# Altium PCB NB3000XN.PcbDoc (part 40 of 71)
Units mil, origin at the board's own origin, x right, y up, seen from the top; angles counter-clockwise.
Board outline 9527.56 x 6929.77 mil, 6 copper layers (Top Layer, GND+SHIELD, MidLayer1, MidLayer2, P2 - 3V3+5V0, Bottom Layer), stack 62.375 mil thick; 832 components, 1027 nets, 4655 pads, 4981 vias.
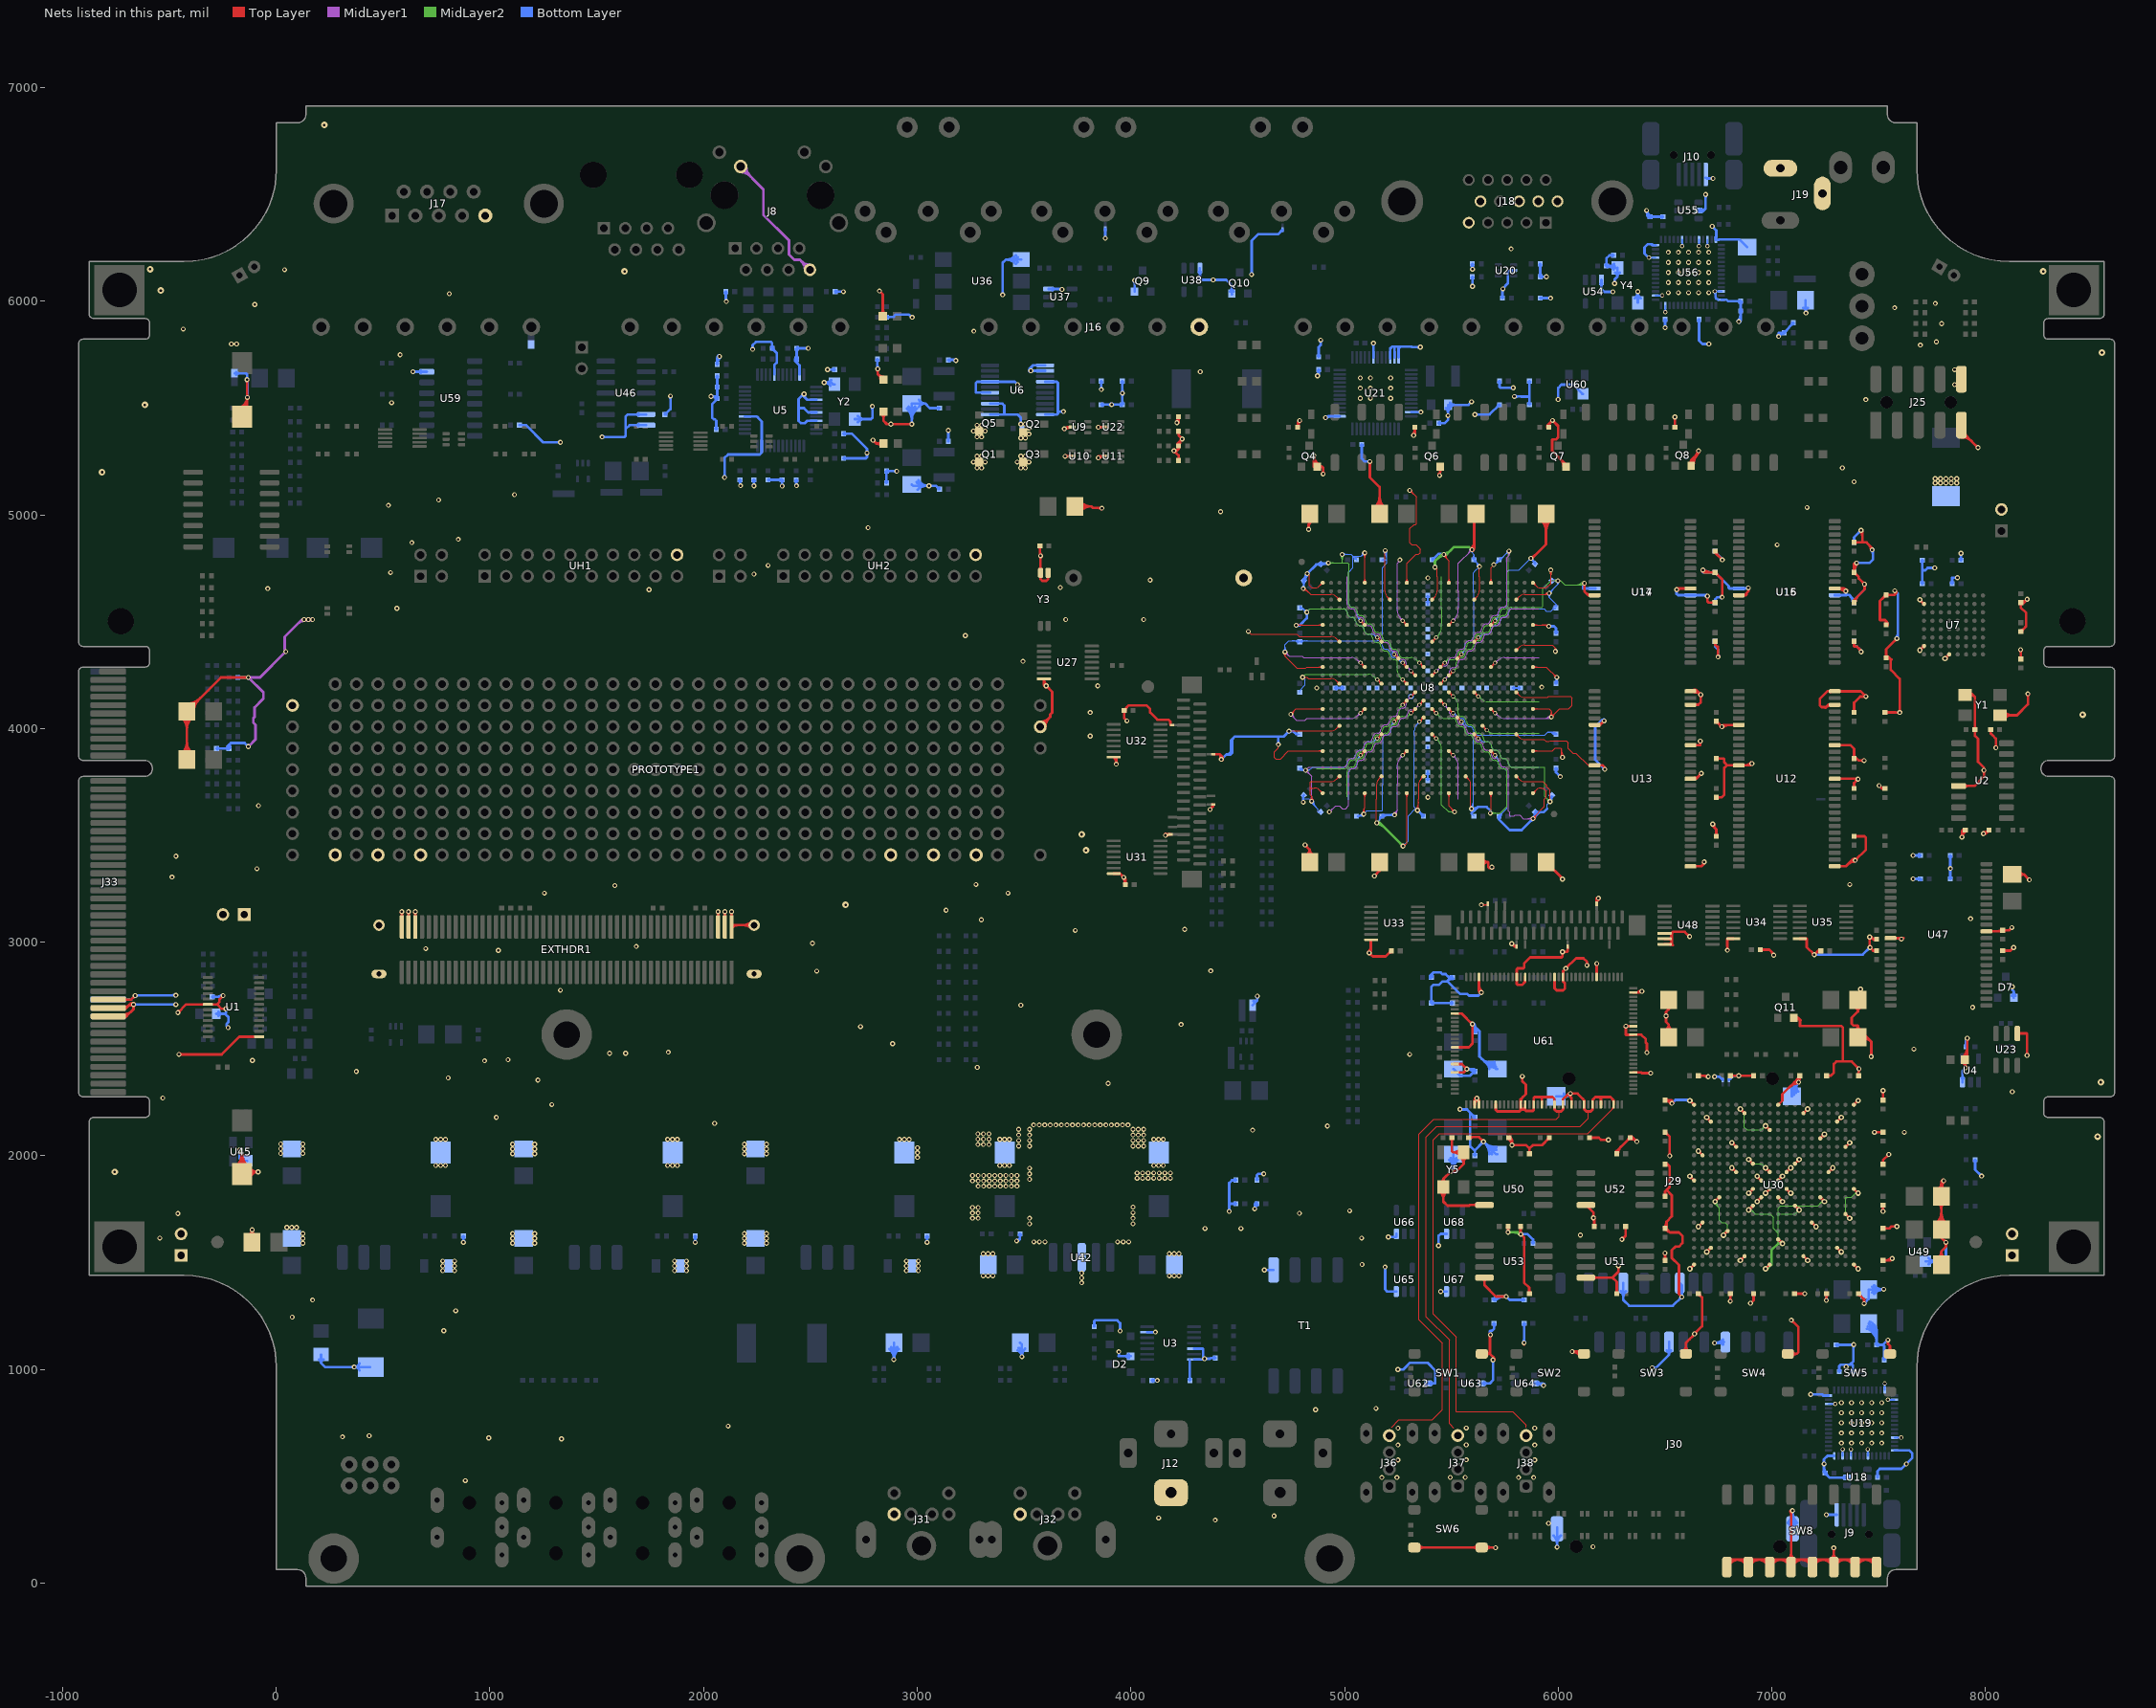
[diagram p44: the nets of this part, all layers, seen from the top]

## Via types
v1: diameter 23, hole 11.81, Top Layer to Bottom Layer, 3672 vias
v2: diameter 26, hole 11.81, Top Layer to Bottom Layer, 461 vias
v3: diameter 19, hole 11.81, Top Layer to Bottom Layer, tented both sides, 396 vias
v4: diameter 23.62, hole 11.81, Top Layer to Bottom Layer, 288 vias
v5: diameter 20, hole 11.81, Top Layer to Bottom Layer, 91 vias
v6: diameter 23, hole 11.81, Top Layer to Bottom Layer, tented both sides, 50 vias
v7: diameter 31, hole 11.81, Top Layer to Bottom Layer, 15 vias
v8: diameter 27.56, hole 11.81, Top Layer to Bottom Layer, tented both sides, 4 vias
v9: diameter 29, hole 11.81, Top Layer to Bottom Layer, 3 vias
v10: diameter 21, hole 11.81, Top Layer to Bottom Layer, 1 vias

## Nets (pads, with @x,y where several pads share a name; then routed paths per layer and width w, separated by ;. In a path a pad name is that pad's centre, name@x,y a point inside that pad or via, vN(x,y) a via of type N, cw(c..) or ccw(c..) an arc to the next point about the centre after c; other vN are vias at no path point) (continued)
GND: BT1.2 C1.2 C2.2 C3.2 C4.2 C7.2 C13.2 C18.2 C20.2 C21.2 C33.2 C34.2 C35.2 C36.2 C37.1 C39.1 C40.2 C41.1 C42.1 C43.2 C44.2 C45.1 C46.1 C47.1 C48.1 C49.2 C50.1 C51.1 C52.1 C53.1 C54.1 C55.2 C56.2 C57.2 C58.2 C59.2 C60.2 C61.2 C62.2 C63.2 C64.2 C65.2 C66.2 C67.2 C68.2 C69.2 C70.2 C71.2 C72.2 C73.2 C74.2 C75.2 C76.2 C77.2 C78.2 C79.2 C80.2 C81.2 C82.2 C83.2 C84.2 C85.2 C86.2 C87.2 C88.1 C89.2 C90.1 C91.1 C92.1 C93.2 C94.2 C95.2 C96.2 C98.2 C99.1 C100.2 C115.2 C116.2 C121.1 C122.1 C123.1 C124.1 C125.1 C126.2 C127.2 C128.2 C129.2 C130.2 C131.2 C132.2 C133.2 C134.2 C135.2 C136.2 C137.2 C138.2 C139.2 C140.2 C141.2 C151.2 C152.1 C153.2 C154.2 C155.2 C156.2 C157.1 C158.2 C159.1 C160.2 C161.1 C162.2 C163.1 C164.2 C165.1 C166.2 C167.2 C168.2 C169.1 C170.1 C171.2 C172.1 C173.1 C174.1 C175.2 C176.2 C177.2 C184.2 C185.2 C187.2 C189.2 C190.2 C191.2 C192.2 C193.2 C194.2 C195.2 C196.2 C197.2 C198.2 C199.2 C200.2 C201.2 C202.2 C203.2 C215.2 C216.2 C217.2 C218.2 C219.2 C220.2 C221.2 C222.2 C223.2 C224.2 C225.2 C226.2 C227.2 C228.2 C229.2 C231.2 C232.2 C233.2 C234.2 C235.2 C236.2 C237.2 C238.2 C239.2 C240.2 C241.2 C242.2 C243.2 C244.2 C245.2 C246.2 C247.2 C248.2 C249.2 C250.2 C251.2 C252.2 C253.2 C254.2 C255.2 C256.2 C257.2 C258.2 C259.2 C260.2 C265.2 C266.2 C267.2 C268.2 C269.2 C270.2 C271.2 C272.2 C273.2 C274.2 C275.2 C276.2 C277.2 C278.2 C279.2 C291.2 C292.2 C293.2 C294.2 C295.2 C296.2 C297.2 C298.2 C299.2 C300.2 C301.2 C302.2 C303.2 C304.2 C305.2 C307.2 C308.2 C309.2 C310.2 C311.2 C312.2 C313.2 C314.2 C315.2 C316.2 C317.2 C318.2 C319.2 C320.2 C321.2 C322.2 C323.2 C324.2 C325.2 C326.2 C327.2 C328.2 C329.2 C330.2 C331.2 C332.2 C333.2 C334.2 C335.2 C336.2 C337.2 C338.2 C339.2 C340.2 C341.2 C342.2 D2.1 D7.1 D10.1 EXTHDR1.1 EXTHDR1.3 EXTHDR1.5 EXTHDR1.95 EXTHDR1.97 EXTHDR1.99 EXTHDR1.MH1 EXTHDR1.MH2 EXTHDR1.MH3 EXTHDR1.MH4 J1.1 J1.2 J2.1 J2.2 J3.1 J3.2 J8.8 J8.10 J9.5 J10.5 J12.1 J16.6 J17.5 J18.5 J18.6 J18.7 J18.8 J18.10 J19.2 J19.3 J24.2 J25.9 J25.10 J29.3 J29.6 J29.GND1 J29.GND2 J30.3 J30.6 J30.GND1 J30.GND2 J31.3 J32.3 J33.A38 J33.A39 J33.A40 J33.B38 J36.4 J37.4 J38.4 LED1.2 LED4.2 LED5.2 LED6.2 LED7.2 NT1.2 NT4.2 NT5.2 NT7.2 NT11.2 NT28.2 NT29.2 NT30.2 NT31.2 NT38.2 NT39.2 NT40.2 NT41.2 NT44.1 NT47.1 NT48.1 PROTOTYPE1.1 PROTOTYPE1.3 PROTOTYPE1.5 PROTOTYPE1.27 PROTOTYPE1.29 PROTOTYPE1.31 Q1.3 Q2.3 Q3.3 Q4.3 Q5.3 Q6.3 Q7.3 Q8.3 Q9.3 Q10.3 Q11.3 R30.2 R34.2 R36.2 R38.1 R41.2 R42.2 R43.2 R44.2 R45.2 R46.2 R47.2 R51.2 R52.2 R56.1 R60.1 R61.2 R64.1 R65.2 R91.1 R93.1 R95.1 R97.1 R109.2 R111.2 R116.1 R117.2 R118.1 R119.2 R120.1 R121.1 R122.1 R124.1 R126.1 R128.1 R130.1 R155.1 R157.1 R160.2 R163.1 R202.2 R204.2 R206.2 R208.2 R246.2 R257.2 R258.2 R259.2 SW1.3 SW2.3 SW3.3 SW4.3 SW5.3 SW6.3 SW6.4 SW8.1 SW8.2 SW8.3 SW8.4 SW8.5 SW8.6 SW8.7 SW8.8 T1.1 TP1.1 TP8.1 U1.6 U1.13 U2.5 U3.5 U3.7 U3.13 U4.3 U5.11 U5.17 U5.29 U5.35 U5.40 U5.43 U5.45 U6.1 U6.2 U6.4 U6.10 U6.11 U6.13 U6.15 U6.17 U7.E8 U7.H2 U7.H7 U8.A1 U8.A6 U8.A11 U8.A16 U8.A21 U8.A26 U8.AA1 U8.AA6 U8.AA11 U8.AA16 U8.AA21 U8.AA26 U8.AD3 U8.AD8 U8.AD13 U8.AD18 U8.AD24 U8.AF1 U8.AF6 U8.AF11 U8.AF16 U8.AF21 U8.AF26 U8.C3 U8.C9 U8.C14 U8.C19 U8.C24 U8.F1 U8.F6 U8.F11 U8.F16 U8.F21 U8.F26 U8.H3 U8.H8 U8.H14 U8.H19 U8.J24 U8.K10 U8.K17 U8.L1 U8.L6 U8.L11 U8.L13 U8.L15 U8.L21 U8.L26 U8.M12 U8.M14 U8.M16 U8.N3 U8.N8 U8.N11 U8.N15 U8.P12 U8.P16 U8.P19 U8.P24 U8.R11 U8.R13 U8.R15 U8.T1 U8.T6 U8.T12 U8.T14 U8.T16 U8.T21 U8.T26 U8.U10 U8.U13 U8.U17 U8.V3 U8.V20 U8.W8 U8.W14 U8.W19 U8.W24 U9.2 U10.2 U11.2 U12.6 U12.12 U12.28 U12.41 U12.46 U12.52 U12.54 U13.6 U13.12 U13.28 U13.41 U13.46 U13.52 U13.54 U14.12 U14.34 U15.12 U15.34 U16.12 U16.34 U17.12 U17.34 U18.2 U19.6 U19.10 U19.12 U19.14 U19.26 U19.28 U19.41 U19.44 U19.53 U19.56 U20.2 U21.11 U21.25 U21.42 U21.46 U21.47 U21.48 U22.2 U23.1 U27.7 U30.A1 U30.A11 U30.A20 U30.B6 U30.B14 U30.C3 U30.C18 U30.D9 U30.E5 U30.E12 U30.F15 U30.G2 U30.G19 U30.H8 U30.H13 U30.J9 U30.J11 U30.K1 U30.K10 U30.K12 U30.K17 U30.L4 U30.L9 U30.L11 U30.L20 U30.M10 U30.M12 U30.N8 U30.N11 U30.N13 U30.P2 U30.P19 U30.R6 U30.R9 U30.T16 U30.U12 U30.V3 U30.V18 U30.W7 U30.W15 U30.Y1 U30.Y10 U30.Y20 U31.7 U32.7 U33.7 U34.7 U35.7 U36.4 U37.3 U38.3 U42.3 U45.1 U46.6 U46.7 U47.12 U47.34 U48.6 U48.7 U48.8 U49.1 U50.4 U51.4 U52.4 U53.4 U54.3 U55.2 U56.6 U56.10 U56.12 U56.14 U56.26 U56.28 U56.41 U56.44 U56.53 U56.56 U59.15 U60.1 U61.3 U61.4 U61.8 U61.14 U61.15 U61.17 U61.19 U61.22 U61.24 U61.26 U61.29 U61.31 U61.33 U61.36 U61.44 U61.53 U61.55 U61.63 U61.71 U61.79 U61.81 U61.88 U61.90 U61.99 U61.109 U61.117 U61.121 U61.123 U62.2 U63.2 U64.2 U65.3 U66.3 U67.3 U68.3 UH1.20 UH2.20 Y1.2 Y1.4 Y2.2 Y2.4 Y3.2 Y3.3 Y4.2 Y4.4 Y5.2 Y5.4 | length 134362.1
  Top Layer w4: v1(4550,4455) 4563.13,4441.87 4760,4441.87 4777.33,4441.87 4788.8,4430.4 4793.8,4430.4 4806,4430.4 4860,4430.4 4870,4430.4 4936.73,4430.4 cw(c4936.73,4391.72) 4964.08,4419.07 ; v1(4690.19,3925.04) 4690.19,3909.71 4672.52,3892.04 4672.52,3864.71 4678.86,3858.37 4701.52,3858.37 4737.87,3894.72 ; v1@4715.28,4350.94 cw(c4705.54,4338.69) 4721.19,4338.69 ; v1(4721.19,4358.37) 4721.19,4338.69 ; v1@4727.1,4350.94 ccw(c4736.84,4338.69) 4721.19,4338.69 ; v1(4740.19,3987.71) 4741.45,3988.97 4855.26,3988.97 4860,3988.97 4870,3988.97 4936.73,3988.97 ccw(c4936.73,4027.65) 4964.08,4000.3 ; v1(4748.52,4066.71) 4773.39,4091.57 4860,4091.57 4870,4091.57 U8.T1@4897.87,4091.57 ; v1@4748.52,4072.21 ccw(c4748.52,4085.49) 4757.91,4076.1 ccw(c4767.3,4066.71) v1@4754.02,4066.71 ; v1@4748.52,4076.21 ccw(c4748.52,4099.14) 4764.74,4082.93 ccw(c4780.96,4066.71) v1@4758.02,4066.71 ; v1(4773.52,4483.37) 4775.43,4485.28 4860,4485.28 4870,4485.28 U8.F1@4897.87,4485.28 ; 4774.72,3894.72 4737.87,3894.72 ; v1@4777.41,4479.49 cw(c4791.39,4465.51) 4791.39,4485.28 ; v1@4780.24,4476.66 cw(c4801.05,4455.85) 4801.05,4485.28 ; v1@4780.24,4490.09 ccw(c4791.87,4501.72) 4791.87,4485.28 ; v1@4807,4645.5 cw(c4807,4604.3) 4836.13,4633.43 ; v1@4807,4649.5 cw(c4807,4617.96) 4829.3,4640.26 ; v1@4807,4653.5 cw(c4807,4631.62) 4822.47,4647.09 ; v1(4807,4655) 4808.85,4656.85 4812.71,4656.85 4842.19,4627.37 4842.19,4627.25 4855.26,4627.25 4860,4627.25 4870,4627.25 4936.73,4627.25 ; v1@4810.69,4233.55 v1(4803.86,4240.37) 4823.17,4240.37 4830,4233.55 4855.26,4233.55 4860,4233.55 4870,4233.55 4936.73,4233.55 cw(c4936.73,4194.87) 4964.08,4222.22 ; v1(4825.19,4725.04) 4835,4715.23 4835,4670 4846.74,4658.26 4856.86,4658.26 ; v1@4839.47,3666.76 ccw(c4823.26,3682.98) 4846.19,3682.98 ccw(c4869.13,3682.98) v1@4852.91,3666.76 ; 4840,3715 4840,3718.47 ; v1@4842.3,3663.93 ccw(c4832.91,3673.32) 4846.19,3673.32 ccw(c4859.47,3673.32) v1@4850.08,3663.93 ; v1(4846.19,3660.04) 4846.19,3683.81 4840,3690 4840,3718.47 ; 4857.99,4658.26 ccw(c4857.99,4696.94) 4885.34,4669.59 ; U8.AF1@4890.53,3697.87 ccw(c4872.8,3697.87) 4885.34,3710.41 ; U8.A1@4890.53,4682.13 cw(c4872.8,4682.13) 4885.34,4669.59 ; U8.AA1@4892.57,3889.42 ccw(c4879.77,3876.62) 4879.77,3894.72 ccw(c4879.77,3912.83) U8.AA1@4892.57,3900.03 ; U8.T1@4892.57,4086.27 ccw(c4879.77,4073.47) 4879.77,4091.57 ccw(c4879.77,4109.68) U8.T1@4892.57,4096.88 ; U8.L1@4892.57,4283.12 ccw(c4879.77,4270.32) 4879.77,4288.43 ccw(c4879.77,4306.53) U8.L1@4892.57,4293.73 ; U8.F1@4892.57,4479.97 ccw(c4879.77,4467.17) 4879.77,4485.28 ccw(c4879.77,4503.38) U8.F1@4892.57,4490.58 ; U8.AA1@4892.68,3889.53 ccw(c4880.15,3877) 4880.15,3894.72 ccw(c4880.15,3912.45) U8.AA1@4892.68,3899.92 ; U8.T1@4892.68,4086.38 ccw(c4880.15,4073.85) 4880.15,4091.57 ccw(c4880.15,4109.3) U8.T1@4892.68,4096.77 ; U8.L1@4892.68,4283.23 ccw(c4880.15,4270.7) 4880.15,4288.43 ccw(c4880.15,4306.15) U8.L1@4892.68,4293.62 ; U8.F1@4892.68,4480.08 ccw(c4880.15,4467.55) 4880.15,4485.28 ccw(c4880.15,4503) U8.F1@4892.68,4490.47 ; U8.AF1@4897.87,3705.22 cw(c4897.87,3722.94) 4885.34,3710.41 ; U8.AA1@4897.87,3894.72 4870,3894.72 4860,3894.72 4737.87,3894.72 ; U8.L1@4897.87,4288.43 4870,4288.43 4860,4288.43 4823.43,4288.43 4817.54,4282.54 4777.34,4282.54 4721.19,4338.69 ; U8.A1@4897.87,4674.78 ccw(c4897.87,4657.06) 4885.34,4669.59 ; U8.AD3@4969.27,3776.61 cw(c4951.55,3776.61) 4964.08,3764.08 ; U8.V3@4969.27,4012.83 cw(c4951.55,4012.83) 4964.08,4000.3 ; U8.N3@4969.27,4209.69 ccw(c4951.55,4209.69) 4964.08,4222.22 ; U8.H3@4969.27,4406.54 ccw(c4951.55,4406.54) 4964.08,4419.07 ; U8.C3@4969.27,4603.39 ccw(c4951.55,4603.39) 4964.08,4615.92 ; U8.AD3@4976.61,3769.27 ccw(c4976.61,3751.55) 4964.08,3764.08 ; U8.V3@4976.61,4005.49 ccw(c4976.61,3987.77) 4964.08,4000.3 ; U8.N3@4976.61,4217.03 cw(c4976.61,4234.75) 4964.08,4222.22 ; U8.H3@4976.61,4413.88 cw(c4976.61,4431.6) 4964.08,4419.07 ; U8.C3@4976.61,4610.73 cw(c4976.61,4628.45) 4964.08,4615.92 ; v3(5075.04,3875.04) U8.AA6@5094.72,3894.72 ; v3(5075.04,4071.89) U8.T6@5094.72,4091.57 ; v3(5075.04,4308.11) U8.L6@5094.72,4288.43 ; v3(5075.04,4504.96) U8.F6@5094.72,4485.28 ; v1@5083.47,3606.76 ccw(c5067.71,3622.52) 5090,3622.52 ; v1@5086.3,3603.93 ccw(c5077.37,3612.86) 5090,3612.86 ; U8.AA6@5087.22,3894.72 cw(c5069.12,3894.72) 5081.92,3881.92 cw(c5094.72,3869.12) U8.AA6@5094.72,3887.22 ; U8.T6@5087.22,4091.57 cw(c5069.12,4091.57) 5081.92,4078.77 cw(c5094.72,4065.97) U8.T6@5094.72,4084.07 ; U8.L6@5087.22,4288.43 ccw(c5069.12,4288.43) 5081.92,4301.23 ccw(c5094.72,4314.03) U8.L6@5094.72,4295.93 ; U8.F6@5087.22,4485.28 ccw(c5069.12,4485.28) 5081.92,4498.08 ccw(c5094.72,4510.88) U8.F6@5094.72,4492.78 ; U8.AA6@5087.38,3894.72 cw(c5069.66,3894.72) 5082.19,3882.19 cw(c5094.72,3869.66) U8.AA6@5094.72,3887.38 ; U8.T6@5087.38,4091.57 cw(c5069.66,4091.57) 5082.19,4079.04 cw(c5094.72,4066.51) U8.T6@5094.72,4084.23 ; U8.L6@5087.38,4288.43 ccw(c5069.66,4288.43) 5082.19,4300.96 ccw(c5094.72,4313.49) U8.L6@5094.72,4295.77 ; U8.F6@5087.38,4485.28 ccw(c5069.66,4485.28) 5082.19,4497.81 ccw(c5094.72,4510.34) U8.F6@5094.72,4492.62 ; v1@5087.81,4815.66 cw(c5071.11,4798.96) 5094.72,4798.96 ; U8.AF6@5089.42,3692.57 cw(c5076.62,3679.77) 5094.72,3679.77 cw(c5112.83,3679.77) U8.AF6@5100.03,3692.57 ; U8.A6@5089.42,4687.43 ccw(c5076.62,4700.23) 5094.72,4700.23 ccw(c5112.83,4700.23) U8.A6@5100.03,4687.43 ; U8.AF6@5089.53,3692.68 cw(c5077,3680.15) 5094.72,3680.15 cw(c5112.45,3680.15) U8.AF6@5099.92,3692.68 ; U8.A6@5089.53,4687.32 ccw(c5077,4699.85) 5094.72,4699.85 ccw(c5112.45,4699.85) U8.A6@5099.92,4687.32 ; 5090,3613.78 ccw(c5103.93,3613.78) v1@5094.08,3603.93 ; 5090,3623.43 ccw(c5113.58,3623.43) v1@5096.91,3606.76 ; v1@5090.64,4818.49 cw(c5080.76,4808.61) 5094.72,4808.61 ; v1(5094.52,4822.37) 5094.72,4822.17 5094.72,4724.74 5094.72,4720 5094.72,4710 U8.A6@5094.72,4682.13 ; v1@5094.72,3604.57 v1(5090.19,3600.04) 5090,3600.23 5090,3625 5094.72,3629.72 5094.72,3660 5094.72,3670 U8.AF6@5094.72,3697.87 ; 5094.72,4799.92 cw(c5116.98,4799.92) v1@5101.24,4815.66 ; 5094.72,4809.58 cw(c5107.32,4809.58) v1@5098.41,4818.49 ; U33.7@5123.52,3011.46 U33.7@5125,3011.46 ; v1(5150.86,3558.37) 5149.6,3559.63 5149.6,3655.26 5149.6,3660 5149.6,3670 5149.6,3736.73 cw(c5188.28,3736.73) 5160.93,3764.08 ; v3(5153.78,3953.78) U8.W8@5173.46,3973.46 ; v3(5153.78,4229.37) U8.N8@5173.46,4209.69 ; v3(5153.78,4426.22) U8.H8@5173.46,4406.54 ; U8.W8@5165.96,3973.46 cw(c5147.86,3973.46) 5160.66,3960.66 cw(c5173.46,3947.86) U8.W8@5173.46,3965.96 ; U8.N8@5165.96,4209.69 ccw(c5147.86,4209.69) 5160.66,4222.49 ccw(c5173.46,4235.29) U8.N8@5173.46,4217.19 ; U8.H8@5165.96,4406.54 ccw(c5147.86,4406.54) 5160.66,4419.34 ccw(c5173.46,4432.14) U8.H8@5173.46,4414.04 ; U8.AD8@5166.12,3776.61 cw(c5148.4,3776.61) 5160.93,3764.08 ; U8.W8@5166.12,3973.46 cw(c5148.4,3973.46) 5160.93,3960.93 cw(c5173.46,3948.4) U8.W8@5173.46,3966.12 ; U8.N8@5166.12,4209.69 ccw(c5148.4,4209.69) 5160.93,4222.22 ccw(c5173.46,4234.75) U8.N8@5173.46,4217.03 ; U8.H8@5166.12,4406.54 ccw(c5148.4,4406.54) 5160.93,4419.07 ccw(c5173.46,4431.6) U8.H8@5173.46,4413.88 ; U8.AD8@5173.46,3769.27 ccw(c5173.46,3751.55) 5160.93,3764.08 ; v1(5190.19,4833.37) 5190.19,4825.04 5188.97,4823.82 5188.97,4724.74 5188.97,4720 5188.97,4710 5188.97,4643.27 ccw(c5227.65,4643.27) 5200.3,4615.92 ; U8.C9@5205.49,4603.39 ccw(c5187.77,4603.39) 5200.3,4615.92 ; U8.C9@5212.83,4610.73 cw(c5212.83,4628.45) 5200.3,4615.92 ; v3(5232.52,4032.52) U8.U10@5252.2,4052.2 ; v3(5232.52,4347.48) U8.K10@5252.2,4327.8 ; U8.U10@5244.7,4052.2 cw(c5226.6,4052.2) 5239.4,4039.4 cw(c5252.2,4026.6) U8.U10@5252.2,4044.7 ; U8.K10@5244.7,4327.8 ccw(c5226.6,4327.8) 5239.4,4340.6 ccw(c5252.2,4353.4) U8.K10@5252.2,4335.3 ; U8.U10@5244.86,4052.2 cw(c5227.14,4052.2) 5239.67,4039.67 cw(c5252.2,4027.14) U8.U10@5252.2,4044.86 ; U8.K10@5244.86,4327.8 ccw(c5227.14,4327.8) 5239.67,4340.33 ccw(c5252.2,4352.86) U8.K10@5252.2,4335.14 ; v3(5271.89,3875.04) U8.AA11@5291.57,3894.72 ; v3(5271.89,4111.26) U8.R11@5291.57,4130.94 ; v3(5271.89,4229.37) U8.N11@5291.57,4209.69 ; v3(5271.89,4308.11) U8.L11@5291.57,4288.43 ; v3(5271.89,4504.96) U8.F11@5291.57,4485.28 ; v1(5273.52,3450.04) 5279.19,3450.04 5291.58,3462.43 ; v1@5275.34,3455.23 ccw(c5279.06,3465.92) 5287.07,3457.92 ; v1@5276.65,3459.01 ccw(c5281.39,3472.61) 5291.57,3462.43 ; v1@5283.02,3450.04 cw(c5292.28,3450.04) 5285.74,3456.59 ; U8.AA11@5284.07,3894.72 cw(c5265.97,3894.72) 5278.77,3881.92 cw(c5291.57,3869.12) U8.AA11@5291.57,3887.22 ; U8.R11@5284.07,4130.94 cw(c5265.97,4130.94) 5278.77,4118.14 cw(c5291.57,4105.34) U8.R11@5291.57,4123.44 ; U8.N11@5284.07,4209.69 ccw(c5265.97,4209.68) 5278.77,4222.49 ccw(c5291.57,4235.29) U8.N11@5291.57,4217.19 ; U8.L11@5284.07,4288.43 ccw(c5265.97,4288.43) 5278.77,4301.23 ccw(c5291.57,4314.03) U8.L11@5291.57,4295.93 ; U8.F11@5284.07,4485.28 ccw(c5265.97,4485.28) 5278.77,4498.08 ccw(c5291.57,4510.88) U8.F11@5291.57,4492.78 ; U8.AA11@5284.23,3894.72 cw(c5266.51,3894.72) 5279.04,3882.19 cw(c5291.57,3869.66) U8.AA11@5291.57,3887.38 ; U8.R11@5284.23,4130.94 cw(c5266.51,4130.94) 5279.04,4118.41 cw(c5291.57,4105.88) U8.R11@5291.57,4123.6 ; U8.N11@5284.23,4209.69 ccw(c5266.51,4209.68) 5279.04,4222.22 ccw(c5291.57,4234.75) U8.N11@5291.57,4217.03 ; U8.L11@5284.23,4288.43 ccw(c5266.51,4288.43) 5279.04,4300.96 ccw(c5291.57,4313.49) U8.L11@5291.57,4295.77 ; U8.F11@5284.23,4485.28 ccw(c5266.51,4485.28) 5279.04,4497.81 ccw(c5291.57,4510.34) U8.F11@5291.57,4492.62 ; U8.AF11@5286.27,3692.57 cw(c5273.47,3679.77) 5291.57,3679.77 cw(c5309.68,3679.77) U8.AF11@5296.88,3692.57 ; U8.A11@5286.27,4687.43 ccw(c5273.47,4700.23) 5291.57,4700.23 ccw(c5309.68,4700.23) U8.A11@5296.88,4687.43 ; U8.AF11@5286.38,3692.68 cw(c5273.85,3680.15) 5291.57,3680.15 cw(c5309.3,3680.15) U8.AF11@5296.77,3692.68 ; U8.A11@5286.38,4687.32 ccw(c5273.85,4699.85) 5291.57,4699.85 ccw(c5309.3,4699.85) U8.A11@5296.77,4687.32 ; U8.AF11@5291.57,3697.87 5291.57,3670 5291.57,3660 5291.57,3655.26 5291.58,3462.43 ; U8.A11@5291.57,4682.13 5291.57,4710 5291.57,4720 5291.57,4772.78 5333.8,4815 5347.02,4815 5355.5,4823.48 5355.5,4838.42 5351.96,4841.96 5345,4848.92 5333.92,4860 5315,4860 5306.02,4868.98 5306.02,4936.02 5325.69,4955.69 5332.17,4955.69 5336.48,4960 5336.48,5083.52 v4(5305,5115) ; v4@5305,5105.19 cw(c5305,5081.5) 5321.75,5098.25 cw(c5338.5,5115) v4@5314.81,5115 ; v4@5305,5109.19 cw(c5305,5095.16) 5314.92,5105.08 cw(c5324.84,5115) v4@5310.81,5115 ; v3(5311.26,4071.89) U8.T12@5330.94,4091.57 ; v3(5311.26,4150.63) U8.P12@5330.94,4170.31 ; v3(5311.26,4268.74) U8.M12@5330.94,4249.06 ; U8.T12@5323.44,4091.57 cw(c5305.34,4091.57) 5318.14,4078.77 cw(c5330.94,4065.97) U8.T12@5330.94,4084.07 ; U8.P12@5323.44,4170.32 cw(c5305.34,4170.32) 5318.14,4157.51 cw(c5330.94,4144.71) U8.P12@5330.94,4162.81 ; U8.M12@5323.44,4249.06 ccw(c5305.34,4249.06) 5318.14,4261.86 ccw(c5330.94,4274.66) U8.M12@5330.94,4256.56 ; U8.T12@5323.6,4091.57 cw(c5305.88,4091.57) 5318.41,4079.04 cw(c5330.94,4066.51) U8.T12@5330.94,4084.23 ; U8.P12@5323.6,4170.32 cw(c5305.88,4170.32) 5318.41,4157.78 cw(c5330.94,4145.25) U8.P12@5330.94,4162.97 ; U8.M12@5323.6,4249.06 ccw(c5305.88,4249.06) 5318.41,4261.59 ccw(c5330.94,4274.12) U8.M12@5330.94,4256.4 ; v1@5335.02,3624.97 ccw(c5310.24,3651.37) 5346.45,3651.37 ; v1@5337.76,3622.05 ccw(c5318.91,3642.13) 5346.45,3642.13 ; v1@5340.5,3619.13 ccw(c5327.58,3632.89) 5346.45,3632.89 ; v1(5341.52,3618.04) 5346.45,3622.97 5346.45,3651.37 ; 5346.45,3629.08 ccw(c5352.56,3629.08) v1@5348.24,3624.76 ; v3(5350.63,4032.52) U8.U13@5370.31,4052.2 ; v3(5350.63,4111.26) U8.R13@5370.31,4130.94 ; v3(5350.63,4308.11) U8.L13@5370.31,4288.43 ; U8.U13@5362.81,4052.2 cw(c5344.71,4052.2) 5357.51,4039.4 cw(c5370.31,4026.6) U8.U13@5370.31,4044.7 ; U8.R13@5362.81,4130.94 cw(c5344.71,4130.94) 5357.51,4118.14 cw(c5370.31,4105.34) U8.R13@5370.31,4123.44 ; U8.L13@5362.81,4288.43 ccw(c5344.71,4288.43) 5357.51,4301.23 ccw(c5370.31,4314.03) U8.L13@5370.31,4295.93 ; U8.AD13@5362.97,3776.61 cw(c5345.25,3776.61) 5357.78,3764.08 ; U8.U13@5362.97,4052.2 cw(c5345.25,4052.2) 5357.78,4039.67 cw(c5370.31,4027.14) U8.U13@5370.31,4044.86 ; U8.R13@5362.97,4130.94 cw(c5345.25,4130.94) 5357.78,4118.41 cw(c5370.31,4105.88) U8.R13@5370.31,4123.6 ; U8.L13@5362.97,4288.43 ccw(c5345.25,4288.43) 5357.78,4300.96 ccw(c5370.31,4313.49) U8.L13@5370.31,4295.77 ; U8.AD13@5370.31,3769.27 ccw(c5370.31,3751.55) 5357.78,3764.08 ; U8.W14@5409.69,3965.96 cw(c5409.69,3947.86) 5422.49,3960.66 cw(c5435.29,3973.46) U8.W14@5417.19,3973.46 ; U8.W14@5409.69,3966.12 cw(c5409.69,3948.4) 5422.22,3960.93 cw(c5434.75,3973.46) U8.W14@5417.03,3973.46 ; U8.W14@5409.69,3973.46 v3(5429.37,3953.78) ; U8.T14@5409.69,4084.07 cw(c5409.69,4065.97) 5422.49,4078.77 cw(c5435.29,4091.57) U8.T14@5417.19,4091.57 ; U8.T14@5409.69,4084.23 cw(c5409.69,4066.51) 5422.22,4079.04 cw(c5434.75,4091.57) U8.T14@5417.03,4091.57 ; U8.T14@5409.69,4091.57 v3(5429.37,4071.89) ; U8.M14@5409.69,4249.06 v3(5429.37,4268.74) ; U8.M14@5409.69,4256.4 ccw(c5409.69,4274.12) 5422.22,4261.59 ccw(c5434.75,4249.06) U8.M14@5417.03,4249.06 ; U8.M14@5409.69,4256.56 ccw(c5409.69,4274.66) 5422.49,4261.86 ccw(c5435.29,4249.06) U8.M14@5417.19,4249.06 ; U8.H14@5409.69,4406.54 v3(5429.37,4426.22) ; U8.H14@5409.69,4413.88 ccw(c5409.69,4431.6) 5422.22,4419.07 ccw(c5434.75,4406.54) U8.H14@5417.03,4406.54 ; U8.H14@5409.69,4414.04 ccw(c5409.69,4432.14) 5422.49,4419.34 ccw(c5435.29,4406.54) U8.H14@5417.19,4406.54 ; U8.C14@5409.69,4610.73 ccw(c5409.69,4628.45) 5422.22,4615.92 ; U8.C14@5417.03,4603.39 cw(c5434.75,4603.39) 5422.22,4615.92 ; v1(5423.52,4755.71) 5433.55,4745.68 5433.55,4720 5433.55,4710 5433.55,4643.27 cw(c5394.87,4643.27) 5422.22,4615.92 ; 5433.55,4724.74 5433.55,4725.04 ; U8.R15@5449.06,4123.44 cw(c5449.06,4105.34) 5461.86,4118.14 cw(c5474.66,4130.94) U8.R15@5456.56,4130.94 ; U8.R15@5449.06,4123.6 cw(c5449.06,4105.88) 5461.59,4118.41 cw(c5474.12,4130.94) U8.R15@5456.4,4130.94 ; U8.R15@5449.06,4130.94 v3(5468.74,4111.26) ; U8.N15@5449.06,4209.69 v3(5468.74,4229.37) ; U8.N15@5449.06,4217.03 ccw(c5449.06,4234.75) 5461.59,4222.22 ccw(c5474.12,4209.68) U8.N15@5456.4,4209.69 ; U8.N15@5449.06,4217.19 ccw(c5449.06,4235.29) 5461.86,4222.49 ccw(c5474.66,4209.68) U8.N15@5456.56,4209.69 ; U8.L15@5449.06,4288.43 v3(5468.74,4308.11) ; U8.L15@5449.06,4295.77 ccw(c5449.06,4313.49) 5461.59,4300.96 ccw(c5474.12,4288.43) U8.L15@5456.4,4288.43 ; U8.L15@5449.06,4295.93 ccw(c5449.06,4314.03) 5461.86,4301.23 ccw(c5474.66,4288.43) U8.L15@5456.56,4288.43 ; v1@5465,4805.5 cw(c5465,4798.1) 5470.23,4803.33 ; v1(5465,4815) 5458.56,4815 5488.43,4785.14 5488.43,4724.74 5488.43,4720 5488.43,4710 U8.A16@5488.43,4682.13 ; v1@5466.5,4814.97 ccw(c5484.84,4814.67) 5471.87,4801.7 ; v1@5470.5,4814.91 ccw(c5497.95,4814.44) 5478.54,4795.03 ; v1@5474.5,4814.84 ccw(c5511.07,4814.22) 5485.21,4788.36 ; U8.AF16@5483.12,3692.57 cw(c5470.32,3679.77) 5488.43,3679.77 cw(c5506.53,3679.77) U8.AF16@5493.73,3692.57 ; U8.A16@5483.12,4687.43 ccw(c5470.32,4700.23) 5488.43,4700.23 ccw(c5506.53,4700.23) U8.A16@5493.73,4687.43 ; U8.AF16@5483.23,3692.68 cw(c5470.7,3680.15) 5488.43,3680.15 cw(c5506.15,3680.15) U8.AF16@5493.62,3692.68 ; U8.A16@5483.23,4687.32 ccw(c5470.7,4699.85) 5488.43,4699.85 ccw(c5506.15,4699.85) U8.A16@5493.62,4687.32 ; U8.AF16@5488.43,3697.87 5488.43,3670 5488.43,3660 5488.43,3655.26 5488.43,3637.81 v1@5515.62,3610.62 ; U8.AA16@5488.43,3887.22 cw(c5488.43,3869.12) 5501.23,3881.92 cw(c5514.03,3894.72) U8.AA16@5495.93,3894.72 ; U8.AA16@5488.43,3887.38 cw(c5488.43,3869.66) 5500.96,3882.19 cw(c5513.49,3894.72) U8.AA16@5495.77,3894.72 ; U8.AA16@5488.43,3894.72 v3(5508.11,3875.04) ; U8.T16@5488.43,4084.07 cw(c5488.43,4065.97) 5501.23,4078.77 cw(c5514.03,4091.57) U8.T16@5495.93,4091.57 ; U8.T16@5488.43,4084.23 cw(c5488.43,4066.51) 5500.96,4079.04 cw(c5513.49,4091.57) U8.T16@5495.77,4091.57 ; U8.T16@5488.43,4091.57 v3(5508.11,4071.89) ; U8.P16@5488.43,4162.81 cw(c5488.43,4144.71) 5501.23,4157.51 cw(c5514.03,4170.32) U8.P16@5495.93,4170.32 ; U8.P16@5488.43,4162.97 cw(c5488.43,4145.25) 5500.96,4157.78 cw(c5513.49,4170.32) U8.P16@5495.77,4170.32 ; U8.P16@5488.43,4170.31 v3(5508.11,4150.63) ; U8.M16@5488.43,4249.06 v3(5508.11,4268.74) ; U8.M16@5488.43,4256.4 ccw(c5488.43,4274.12) 5500.96,4261.59 ccw(c5513.49,4249.06) U8.M16@5495.77,4249.06 ; U8.M16@5488.43,4256.56 ccw(c5488.43,4274.66) 5501.23,4261.86 ccw(c5514.03,4249.06) U8.M16@5495.93,4249.06 ; U8.F16@5488.43,4485.28 v3(5508.11,4504.96) ; U8.F16@5488.43,4492.62 ccw(c5488.43,4510.34) 5500.96,4497.81 ccw(c5513.49,4485.28) U8.F16@5495.77,4485.28 ; U8.F16@5488.43,4492.78 ccw(c5488.43,4510.88) 5501.23,4498.08 ccw(c5514.03,4485.28) U8.F16@5495.93,4485.28 ; 5497.91,3628.32 cw(c5479.59,3610) v1@5505.5,3610 ; 5500.89,3625.35 ccw(c5515,3639.46) v1@5515,3619.5 ; 5504.74,3621.49 cw(c5493.25,3610) v1@5509.5,3610 ; U8.U17@5527.8,4044.7 cw(c5527.8,4026.6) 5540.6,4039.4 cw(c5553.4,4052.2) U8.U17@5535.3,4052.2 ; U8.U17@5527.8,4044.86 cw(c5527.8,4027.14) 5540.33,4039.67 cw(c5552.86,4052.2) U8.U17@5535.14,4052.2 ; U8.U17@5527.8,4052.2 v3(5547.48,4032.52) ; U8.K17@5527.8,4327.8 v3(5547.48,4347.48) ; U8.K17@5527.8,4335.14 ccw(c5527.8,4352.86) 5540.33,4340.33 ccw(c5552.86,4327.8) U8.K17@5535.14,4327.8 ; U8.K17@5527.8,4335.3 ccw(c5527.8,4353.4) 5540.6,4340.6 ccw(c5553.4,4327.8) U8.K17@5535.3,4327.8 ; U8.AD18@5567.17,3769.27 cw(c5567.17,3751.55) 5579.7,3764.08 ; U8.AD18@5574.51,3776.61 ccw(c5592.23,3776.61) 5579.7,3764.08 ; v1(5594.19,3624.71) 5590.86,3628.04 5590.86,3636.2 5591.03,3636.2 5591.03,3655.26 5591.03,3660 5591.03,3670 5591.03,3736.73 ccw(c5552.35,3736.73) 5579.7,3764.08 ; U8.W19@5606.54,3965.96 cw(c5606.54,3947.86) 5619.34,3960.66 cw(c5632.14,3973.46) U8.W19@5614.04,3973.46 ; U8.W19@5606.54,3966.12 cw(c5606.54,3948.4) 5619.07,3960.93 cw(c5631.6,3973.46) U8.W19@5613.88,3973.46 ; U8.W19@5606.54,3973.46 v3(5626.22,3953.78) ; U8.P19@5606.54,4162.81 cw(c5606.54,4144.71) 5619.34,4157.51 cw(c5632.14,4170.31) U8.P19@5614.04,4170.31 ; U8.P19@5606.54,4162.97 cw(c5606.54,4145.25) 5619.07,4157.78 cw(c5631.6,4170.31) U8.P19@5613.88,4170.31 ; U8.P19@5606.54,4170.31 v3(5626.22,4150.63) ; U8.H19@5606.54,4406.54 v3(5626.22,4426.22) ; U8.H19@5606.54,4413.88 ccw(c5606.54,4431.6) 5619.07,4419.07 ccw(c5631.6,4406.54) U8.H19@5613.88,4406.54 ; U8.H19@5606.54,4414.04 ccw(c5606.54,4432.14) 5619.34,4419.34 ccw(c5632.14,4406.54) U8.H19@5614.04,4406.54 ; U8.C19@5606.54,4610.73 ccw(c5606.54,4628.45) 5619.07,4615.92 ; U8.C19@5613.88,4603.39 cw(c5631.6,4603.39) 5619.07,4615.92 ; v1(5631.86,4758.37) 5630.4,4756.91 5630.4,4724.74 5630.4,4720 5630.4,4710 5630.4,4643.27 cw(c5591.72,4643.27) 5619.07,4615.92 ; v1(5640.19,3175.04) 5665.04,3175.04 NT40.2@5670,3180 ; v1@5644.08,3171.15 cw(c5653.47,3161.76) 5653.47,3175.04 cw(c5653.47,3188.32) v1@5644.08,3178.93 ; U8.V20@5645.91,4005.33 cw(c5645.91,3987.23) 5658.71,4000.03 cw(c5671.51,4012.83) U8.V20@5653.41,4012.83 ; U8.V20@5645.91,4005.49 cw(c5645.91,3987.77) 5658.44,4000.3 cw(c5670.97,4012.83) U8.V20@5653.25,4012.83 ; U8.V20@5645.91,4012.83 v3(5665.59,3993.15) ; v1@5646.91,3168.32 cw(c5663.13,3152.11) 5663.13,3175.04 cw(c5663.13,3197.98) v1@5646.91,3181.76 ; 5659.23,3175.04 ccw(c5659.23,3186.27) NT40.2@5667.17,3178.33 ; 5661.45,3175.04 cw(c5661.45,3166.95) NT40.2@5667.17,3172.67 ; U8.AF21@5679.97,3692.57 cw(c5667.17,3679.77) 5685.28,3679.77 cw(c5703.38,3679.77) U8.AF21@5690.58,3692.57 ; U8.A21@5679.97,4687.43 ccw(c5667.17,4700.23) 5685.28,4700.23 ccw(c5703.38,4700.23) U8.A21@5690.58,4687.43 ; U8.AF21@5680.08,3692.68 cw(c5667.55,3680.15) 5685.28,3680.15 cw(c5703,3680.15) U8.AF21@5690.47,3692.68 ; U8.A21@5680.08,4687.32 ccw(c5667.55,4699.85) 5685.28,4699.85 ccw(c5703,4699.85) U8.A21@5690.47,4687.32 ; v1(5682.52,3603.71) 5682.52,3618.37 5685.28,3621.13 5685.28,3655.26 5685.28,3660 5685.28,3670 U8.AF21@5685.28,3697.87 ; U8.AA21@5685.28,3887.22 cw(c5685.28,3869.12) 5698.08,3881.92 cw(c5710.88,3894.72) U8.AA21@5692.78,3894.72 ; U8.AA21@5685.28,3887.38 cw(c5685.28,3869.66) 5697.81,3882.19 cw(c5710.34,3894.72) U8.AA21@5692.62,3894.72 ; U8.AA21@5685.28,3894.72 v3(5704.96,3875.04) ; U8.T21@5685.28,4084.07 cw(c5685.28,4065.97) 5698.08,4078.77 cw(c5710.88,4091.57) U8.T21@5692.78,4091.57 ; U8.T21@5685.28,4084.23 cw(c5685.28,4066.51) 5697.81,4079.04 cw(c5710.34,4091.57) U8.T21@5692.62,4091.57 ; U8.T21@5685.28,4091.57 v3(5704.96,4071.89) ; U8.L21@5685.28,4288.43 v3(5704.96,4308.11) ; U8.L21@5685.28,4295.77 ccw(c5685.28,4313.49) 5697.81,4300.96 ccw(c5710.34,4288.43) U8.L21@5692.62,4288.43 ; U8.L21@5685.28,4295.93 ccw(c5685.28,4314.03) 5698.08,4301.23 ccw(c5710.88,4288.43) U8.L21@5692.78,4288.43 ; U8.F21@5685.28,4485.28 v3(5704.96,4504.96) ; U8.F21@5685.28,4492.62 ccw(c5685.28,4510.34) 5697.81,4497.81 ccw(c5710.34,4485.28) U8.F21@5692.62,4485.28 ; U8.F21@5685.28,4492.78 ccw(c5685.28,4510.88) 5698.08,4498.08 ccw(c5710.88,4485.28) U8.F21@5692.78,4485.28 ; U8.A21@5685.28,4682.13 5685.28,4710 5685.28,4720 5685.28,4724.74 5685.28,4754.13 v1(5698.52,4767.37) ; U8.AD24@5803.39,3769.27 cw(c5803.39,3751.55) 5815.92,3764.08 ; U8.W24@5803.39,3966.12 cw(c5803.39,3948.4) 5815.92,3960.93 ; U8.P24@5803.39,4162.97 cw(c5803.39,4145.25) 5815.92,4157.78 ; U8.J24@5803.39,4374.51 ccw(c5803.39,4392.23) 5815.92,4379.7 ; U8.C24@5803.39,4610.73 ccw(c5803.39,4628.45) 5815.92,4615.92 ; U8.AD24@5810.73,3776.61 ccw(c5828.45,3776.61) 5815.92,3764.08 ; U8.W24@5810.73,3973.46 ccw(c5828.45,3973.46) 5815.92,3960.93 ; U8.P24@5810.73,4170.31 ccw(c5828.45,4170.31) 5815.92,4157.78 ; U8.J24@5810.73,4367.17 cw(c5828.45,4367.17) 5815.92,4379.7 ; U8.C24@5810.73,4603.39 cw(c5828.45,4603.39) 5815.92,4615.92 ; U8.AF26@5882.13,3705.22 ccw(c5882.13,3722.94) 5894.66,3710.41 ; U8.AA26@5882.13,3894.72 5910,3894.72 5920,3894.72 5972.23,3894.72 5986.72,3909.21 6010.79,3909.21 6015,3905 6015,3870 v1(6020,3865) ; U8.T26@5882.13,4091.57 5910,4091.57 5920,4091.57 5924.74,4091.57 5958.43,4091.57 5967.86,4082.14 v1(5967.86,4053.71) 6005.65,4091.5 6048.32,4091.5 6065.19,4108.37 6065.19,4142.71 6057.86,4150.04 5981.86,4150.04 5969.95,4150.03 5954.99,4150.01 5951.41,4146.43 5942.4,4146.43 ; U8.L26@5882.13,4288.43 5910,4288.43 5920,4288.43 5924.74,4288.43 5944.81,4288.42 v1(5993.52,4239.71) ; U8.F26@5882.13,4485.28 5910,4485.28 5920,4485.28 5924.74,4485.28 ; U8.A26@5882.13,4674.78 cw(c5882.13,4657.06) 5894.66,4669.59 ; v1(5882.52,3578.37) 5882.52,3582.52 5936.02,3636.02 5936.02,3668.94 5945,3677.91 5945,3706.69 5929.95,3721.74 5922.01,3721.74 ccw(c5922.01,3683.06) 5894.66,3710.41 ; v1@5882.52,3587.87 ccw(c5882.52,3600.79) 5891.66,3591.66 ; U8.AA26@5887.32,3889.53 cw(c5899.85,3877) 5899.85,3894.72 cw(c5899.85,3912.45) U8.AA26@5887.32,3899.92 ; U8.T26@5887.32,4086.38 cw(c5899.85,4073.85) 5899.85,4091.57 cw(c5899.85,4109.3) U8.T26@5887.32,4096.77 ; U8.L26@5887.32,4283.23 cw(c5899.85,4270.7) 5899.85,4288.43 cw(c5899.85,4306.15) U8.L26@5887.32,4293.62 ; U8.F26@5887.32,4480.08 cw(c5899.85,4467.55) 5899.85,4485.28 cw(c5899.85,4503) U8.F26@5887.32,4490.47 ; U8.AA26@5887.43,3889.42 cw(c5900.23,3876.62) 5900.23,3894.72 cw(c5900.23,3912.83) U8.AA26@5887.43,3900.03 ; U8.T26@5887.43,4086.27 cw(c5900.23,4073.47) 5900.23,4091.57 cw(c5900.23,4109.68) U8.T26@5887.43,4096.88 ; U8.L26@5887.43,4283.12 cw(c5900.23,4270.32) 5900.23,4288.43 cw(c5900.23,4306.53) U8.L26@5887.43,4293.73 ; U8.F26@5887.43,4479.97 cw(c5900.23,4467.17) 5900.23,4485.28 cw(c5900.23,4503.38) U8.F26@5887.43,4490.58 ; v1@5888.02,3578.37 cw(c5911.32,3578.37) 5894.85,3594.85 ; U8.AF26@5889.47,3697.87 cw(c5907.2,3697.87) 5894.66,3710.41 ; U8.A26@5889.47,4682.13 ccw(c5907.2,4682.13) 5894.66,4669.59 ; v1@5892.02,3578.37 cw(c5924.98,3578.37) 5901.68,3601.68 ; 5924.74,4658.26 5940.52,4658.26 ; 5932.82,4485.28 cw(c5932.82,4460.97) v1@5952.15,4475.71 ; 5933.22,4627.25 ccw(c5933.22,4653.67) v1@5953.61,4636.87 ; 5940.9,4485.28 cw(c5940.9,4467.13) v1@5955.33,4478.13 ; 5941.7,4627.25 ccw(c5941.7,4646.69) v1@5956.7,4634.33 ; v1@5948.97,4473.28 ccw(c5924.74,4454.81) 5924.74,4485.28 ; v1@5950.52,4639.41 cw(c5924.74,4660.65) 5924.74,4627.25 ; v1(5956.52,4479.04) 5950.29,4485.28 5924.74,4485.28 ; v1(5957.86,4633.37) 5955.65,4631.17 5954.65,4631.17 5954.65,4630.91 5950.98,4627.25 5924.74,4627.25 ; v1@5958.47,4735.99 cw(c5942.26,4719.77) 5965.19,4719.77 cw(c5988.13,4719.77) v1@5971.91,4735.99 ; v1@5961.14,4060.43 ccw(c5944.92,4076.64) 5967.86,4076.64 ccw(c5990.79,4076.64) v1@5974.57,4060.43 ; v1@5961.3,4738.82 cw(c5951.91,4729.43) 5965.19,4729.43 cw(c5978.47,4729.43) v1@5969.08,4738.82 ; v1(5961.52,3658.37) 5961.52,3712.79 5946.19,3728.13 5946.19,3735.3 5928.74,3752.75 5924.74,3752.75 5920,3752.75 5910,3752.75 5843.27,3752.75 ; v1@5963.97,4057.6 ccw(c5954.58,4066.99) 5967.86,4066.99 ccw(c5981.14,4066.99) v1@5971.75,4057.6 ; v1(5965.19,4742.71) 5965.19,4680.19 5943.26,4658.26 5922.01,4658.26 cw(c5922.01,4696.94) 5894.66,4669.59 ; v1@5967.86,4059.21 ccw(c5967.86,4072.49) 5977.25,4063.1 ccw(c5986.64,4053.71) v1@5973.36,4053.71 ; v1@5967.86,4063.21 ccw(c5967.86,4086.14) 5984.07,4069.93 ccw(c6000.29,4053.71) v1@5977.36,4053.71 ; v1@5982.31,4369.19 ccw(c5977.14,4377.81) 5987.19,4377.81 ; v1@5984.02,4239.71 ccw(c5961.09,4239.71) 5977.31,4255.93 ccw(c5993.52,4272.14) v1@5993.52,4249.21 ; v1(5987.19,4361.04) 5987.19,4377.81 ; v1@5988.02,4239.71 ccw(c5974.75,4239.71) 5984.14,4249.1 ccw(c5993.52,4258.49) v1@5993.52,4245.21 ; v1@5992.07,4369.19 cw(c5997.24,4377.81) 5987.19,4377.81 ; v1@6013.28,3871.72 ccw(c6009.14,3875.86) 6015,3875.86 ; 6015,3880.69 ccw(c6035.69,3880.69) v1@6021.06,3866.06 ; 6015,3890.35 ccw(c6045.35,3890.35) v1@6023.89,3868.89 ; 6015,3900.01 ccw(c6055.01,3900.01) v1@6026.72,3871.72 ; 6139.86,3828.04 6083.52,3884.37 6069.79,3884.37 6048.02,3906.15 6048.02,3932.87 6037.75,3943.15 5961.05,3943.15 5957.77,3939.87 5943.28,3939.87 5933.55,3949.6 5920,3949.6 5910,3949.6 5843.27,3949.6 cw(c5843.27,3988.28) 5815.92,3960.93 ; U13.12@6145.93,3824.3 ccw(c6139.86,3821.14) 6139.86,3827.99 ; U13.12@6145.93,3831.68 cw(c6139.86,3834.84) 6139.86,3827.99 ; U13.12@6170.59,3827.99 6139.86,3827.99 ; v1(6218.52,3809.04) v1@6218.52,3817.66 ; 4840,3718.47 4840,3725 ; 4840,3718.47 4843.26,3721.74 ; 4840,3725 4840,3750 4842.75,3752.75 4860,3752.75 4870,3752.75 4936.73,3752.75 ; 4840,3725 4843.26,3721.74 ; 4843.26,3721.74 4857.99,3721.74 cw(c4857.99,3683.06) 4885.34,3710.41 ; 4936.73,3752.75 ccw(c4936.73,3791.43) 4964.08,3764.08 ; 4936.73,3752.75 ccw(c4936.73,3791.43) 4964.08,3764.08 ; 4936.73,4627.25 cw(c4936.73,4588.57) 4964.08,4615.92 ; 4936.73,4627.25 cw(c4936.73,4588.57) 4964.08,4615.92 ; 5087.84,3887.84 ccw(c5100.65,3875.04) 5082.54,3875.04 cw(c5100.65,3875.04) 5087.84,3887.84 ; 5087.84,3887.84 cw(c5075.04,3900.65) 5075.04,3882.54 ccw(c5075.04,3900.65) 5087.84,3887.84 ; 5087.84,4084.69 cw(c5075.04,4097.5) 5075.04,4079.39 ccw(c5075.04,4097.5) 5087.84,4084.69 ; 5087.84,4084.69 ccw(c5100.65,4071.89) 5082.54,4071.89 cw(c5100.65,4071.89) 5087.84,4084.69 ; 5087.84,4295.31 cw(c5100.65,4308.11) 5082.54,4308.11 ccw(c5100.65,4308.11) 5087.84,4295.31 ; 5087.84,4295.31 ccw(c5075.04,4282.5) 5075.04,4300.61 cw(c5075.04,4282.5) 5087.84,4295.31 ; 5087.84,4492.16 cw(c5100.65,4504.96) 5082.54,4504.96 ccw(c5100.65,4504.96) 5087.84,4492.16 ; 5087.84,4492.16 ccw(c5075.04,4479.35) 5075.04,4497.46 cw(c5075.04,4479.35) 5087.84,4492.16 ; 5166.58,3966.58 ccw(c5179.39,3953.78) 5161.28,3953.78 cw(c5179.39,3953.78) 5166.58,3966.58 ; 5166.58,3966.58 cw(c5153.78,3979.39) 5153.78,3961.28 ccw(c5153.78,3979.39) 5166.58,3966.58 ; 5166.58,4216.57 cw(c5179.39,4229.37) 5161.28,4229.37 ccw(c5179.39,4229.37) 5166.58,4216.57 ; 5166.58,4216.57 ccw(c5153.78,4203.76) 5153.78,4221.87 cw(c5153.78,4203.76) 5166.58,4216.57 ; 5166.58,4413.42 cw(c5179.39,4426.22) 5161.28,4426.22 ccw(c5179.39,4426.22) 5166.58,4413.42 ; 5166.58,4413.42 ccw(c5153.78,4400.61) 5153.78,4418.72 cw(c5153.78,4400.61) 5166.58,4413.42 ; 5245.32,4045.32 cw(c5232.52,4058.13) 5232.52,4040.02 ccw(c5232.52,4058.13) 5245.32,4045.32 ; 5245.32,4045.32 ccw(c5258.13,4032.52) 5240.02,4032.52 cw(c5258.13,4032.52) 5245.32,4045.32 ; 5245.32,4334.68 cw(c5258.13,4347.48) 5240.02,4347.48 ccw(c5258.13,4347.48) 5245.32,4334.68 ; 5245.32,4334.68 ccw(c5232.52,4321.87) 5232.52,4339.98 cw(c5232.52,4321.87) 5245.32,4334.68 ; 5284.69,3887.84 ccw(c5297.5,3875.04) 5279.39,3875.04 cw(c5297.5,3875.04) 5284.69,3887.84 ; 5284.69,3887.84 cw(c5271.89,3900.65) 5271.89,3882.54 ccw(c5271.89,3900.65) 5284.69,3887.84 ; 5284.69,4124.06 cw(c5271.89,4136.87) 5271.89,4118.76 ccw(c5271.89,4136.87) 5284.69,4124.06 ; 5284.69,4124.06 ccw(c5297.5,4111.26) 5279.39,4111.26 cw(c5297.5,4111.26) 5284.69,4124.06 ; 5284.69,4216.57 cw(c5297.5,4229.37) 5279.39,4229.37 ccw(c5297.5,4229.37) 5284.69,4216.57 ; 5284.69,4216.57 ccw(c5271.89,4203.76) 5271.89,4221.87 cw(c5271.89,4203.76) 5284.69,4216.57 ; 5284.69,4295.31 cw(c5297.5,4308.11) 5279.39,4308.11 ccw(c5297.5,4308.11) 5284.69,4295.31 ; 5284.69,4295.31 ccw(c5271.89,4282.5) 5271.89,4300.61 cw(c5271.89,4282.5) 5284.69,4295.31 ; 5284.69,4492.16 cw(c5297.5,4504.96) 5279.39,4504.96 ccw(c5297.5,4504.96) 5284.69,4492.16 ; 5284.69,4492.16 ccw(c5271.89,4479.35) 5271.89,4497.46 cw(c5271.89,4479.35) 5284.69,4492.16 ; 5324.06,4084.69 cw(c5311.26,4097.5) 5311.26,4079.39 ccw(c5311.26,4097.5) 5324.06,4084.69 ; 5324.06,4084.69 ccw(c5336.87,4071.89) 5318.76,4071.89 cw(c5336.87,4071.89) 5324.06,4084.69 ; 5324.06,4163.43 cw(c5311.26,4176.24) 5311.26,4158.13 ccw(c5311.26,4176.24) 5324.06,4163.43 ; 5324.06,4163.43 ccw(c5336.87,4150.63) 5318.76,4150.63 cw(c5336.87,4150.63) 5324.06,4163.43 ; 5324.06,4255.94 cw(c5336.87,4268.74) 5318.76,4268.74 ccw(c5336.87,4268.74) 5324.06,4255.94 ; 5324.06,4255.94 ccw(c5311.26,4243.13) 5311.26,4261.24 cw(c5311.26,4243.13) 5324.06,4255.94 ; 5346.46,3651.37 5346.45,3655.26 5346.45,3660 ; 5346.45,3651.37 5346.45,3660 ; 5346.45,3660 5346.45,3670 5346.45,3736.73 cw(c5385.13,3736.73) 5357.78,3764.08 ; 5363.43,4045.32 cw(c5350.63,4058.13) 5350.63,4040.02 ccw(c5350.63,4058.13) 5363.43,4045.32 ; 5363.43,4045.32 ccw(c5376.24,4032.52) 5358.13,4032.52 cw(c5376.24,4032.52) 5363.43,4045.32 ; 5363.43,4124.06 cw(c5350.63,4136.87) 5350.63,4118.76 ccw(c5350.63,4136.87) 5363.43,4124.06 ; 5363.43,4124.06 ccw(c5376.24,4111.26) 5358.13,4111.26 cw(c5376.24,4111.26) 5363.43,4124.06 ; 5363.43,4295.31 cw(c5376.24,4308.11) 5358.13,4308.11 ccw(c5376.24,4308.11) 5363.43,4295.31 ; 5363.43,4295.31 ccw(c5350.63,4282.5) 5350.63,4300.61 cw(c5350.63,4282.5) 5363.43,4295.31 ; 5416.57,3966.58 cw(c5403.76,3953.78) 5421.87,3953.78 ccw(c5403.76,3953.78) 5416.57,3966.58 ; 5416.57,3966.58 ccw(c5429.37,3979.39) 5429.37,3961.28 cw(c5429.37,3979.39) 5416.57,3966.58 ; 5416.57,4084.69 cw(c5403.76,4071.89) 5421.87,4071.89 ccw(c5403.76,4071.89) 5416.57,4084.69 ; 5416.57,4084.69 ccw(c5429.37,4097.5) 5429.37,4079.39 cw(c5429.37,4097.5) 5416.57,4084.69 ; 5416.57,4255.94 cw(c5429.37,4243.13) 5429.37,4261.24 ccw(c5429.37,4243.13) 5416.57,4255.94 ; 5416.57,4255.94 ccw(c5403.76,4268.74) 5421.87,4268.74 cw(c5403.76,4268.74) 5416.57,4255.94 ; 5416.57,4413.42 cw(c5429.37,4400.61) 5429.37,4418.72 ccw(c5429.37,4400.61) 5416.57,4413.42 ; 5416.57,4413.42 ccw(c5403.76,4426.22) 5421.87,4426.22 cw(c5403.76,4426.22) 5416.57,4413.42 ; 5455.94,4124.06 cw(c5443.13,4111.26) 5461.24,4111.26 ccw(c5443.13,4111.26) 5455.94,4124.06 ; 5455.94,4124.06 ccw(c5468.74,4136.87) 5468.74,4118.76 cw(c5468.74,4136.87) 5455.94,4124.06 ; 5455.94,4216.57 cw(c5468.74,4203.76) 5468.74,4221.87 ccw(c5468.74,4203.76) 5455.94,4216.57 ; 5455.94,4216.57 ccw(c5443.13,4229.37) 5461.24,4229.37 cw(c5443.13,4229.37) 5455.94,4216.57 ; 5455.94,4295.31 cw(c5468.74,4282.5) 5468.74,4300.61 ccw(c5468.74,4282.5) 5455.94,4295.31 ; 5455.94,4295.31 ccw(c5443.13,4308.11) 5461.24,4308.11 cw(c5443.13,4308.11) 5455.94,4295.31 ; 5495.31,3887.84 cw(c5482.5,3875.04) 5500.61,3875.04 ccw(c5482.5,3875.04) 5495.31,3887.84 ; 5495.31,3887.84 ccw(c5508.11,3900.65) 5508.11,3882.54 cw(c5508.11,3900.65) 5495.31,3887.84 ; 5495.31,4084.69 cw(c5482.5,4071.89) 5500.61,4071.89 ccw(c5482.5,4071.89) 5495.31,4084.69 ; 5495.31,4084.69 ccw(c5508.11,4097.5) 5508.11,4079.39 cw(c5508.11,4097.5) 5495.31,4084.69 ; 5495.31,4163.43 cw(c5482.5,4150.63) 5500.61,4150.63 ccw(c5482.5,4150.63) 5495.31,4163.43 ; 5495.31,4163.43 ccw(c5508.11,4176.24) 5508.11,4158.13 cw(c5508.11,4176.24) 5495.31,4163.43 ; 5495.31,4255.94 cw(c5508.11,4243.13) 5508.11,4261.24 ccw(c5508.11,4243.13) 5495.31,4255.94 ; 5495.31,4255.94 ccw(c5482.5,4268.74) 5500.61,4268.74 cw(c5482.5,4268.74) 5495.31,4255.94 ; 5495.31,4492.16 cw(c5508.11,4479.35) 5508.11,4497.46 ccw(c5508.11,4479.35) 5495.31,4492.16 ; 5495.31,4492.16 ccw(c5482.5,4504.96) 5500.61,4504.96 cw(c5482.5,4504.96) 5495.31,4492.16 ; 5534.68,4045.32 cw(c5521.87,4032.52) 5539.98,4032.52 ccw(c5521.87,4032.52) 5534.68,4045.32 ; 5534.68,4045.32 ccw(c5547.48,4058.13) 5547.48,4040.02 cw(c5547.48,4058.13) 5534.68,4045.32 ; 5534.68,4334.68 cw(c5547.48,4321.87) 5547.48,4339.98 ccw(c5547.48,4321.87) 5534.68,4334.68 ; 5534.68,4334.68 ccw(c5521.87,4347.48) 5539.98,4347.48 cw(c5521.87,4347.48) 5534.68,4334.68 ; 5613.42,3966.58 cw(c5600.61,3953.78) 5618.72,3953.78 ccw(c5600.61,3953.78) 5613.42,3966.58 ; 5613.42,3966.58 ccw(c5626.22,3979.39) 5626.22,3961.28 cw(c5626.22,3979.39) 5613.42,3966.58 ; 5613.42,4163.43 cw(c5600.61,4150.63) 5618.72,4150.63 ccw(c5600.61,4150.63) 5613.42,4163.43 ; 5613.42,4163.43 ccw(c5626.22,4176.24) 5626.22,4158.13 cw(c5626.22,4176.24) 5613.42,4163.43 ; 5613.42,4413.42 cw(c5626.22,4400.61) 5626.22,4418.72 ccw(c5626.22,4400.61) 5613.42,4413.42 ; 5613.42,4413.42 ccw(c5600.61,4426.22) 5618.72,4426.22 cw(c5600.61,4426.22) 5613.42,4413.42 ; 5652.79,4005.95 cw(c5639.98,3993.15) 5658.09,3993.15 ccw(c5639.98,3993.15) 5652.79,4005.95 ; 5652.79,4005.95 ccw(c5665.59,4018.76) 5665.59,4000.65 cw(c5665.59,4018.76) 5652.79,4005.95 ; 5692.16,3887.84 cw(c5679.35,3875.04) 5697.46,3875.04 ccw(c5679.35,3875.04) 5692.16,3887.84 ; 5692.16,3887.84 ccw(c5704.96,3900.65) 5704.96,3882.54 cw(c5704.96,3900.65) 5692.16,3887.84 ; 5692.16,4084.69 cw(c5679.35,4071.89) 5697.46,4071.89 ccw(c5679.35,4071.89) 5692.16,4084.69 ; 5692.16,4084.69 ccw(c5704.96,4097.5) 5704.96,4079.39 cw(c5704.96,4097.5) 5692.16,4084.69 ; 5692.16,4295.31 cw(c5704.96,4282.5) 5704.96,4300.61 ccw(c5704.96,4282.5) 5692.16,4295.31 ; 5692.16,4295.31 ccw(c5679.35,4308.11) 5697.46,4308.11 cw(c5679.35,4308.11) 5692.16,4295.31 ; 5692.16,4492.16 cw(c5704.96,4479.35) 5704.96,4497.46 ccw(c5704.96,4479.35) 5692.16,4492.16 ; 5692.16,4492.16 ccw(c5679.35,4504.96) 5697.46,4504.96 cw(c5679.35,4504.96) 5692.16,4492.16 ; 5815.92,3764.08 ccw(c5843.27,3791.43) 5843.27,3752.75 ; 5815.92,3764.08 ccw(c5843.27,3791.43) 5843.27,3752.75 ; 5815.92,4157.78 ccw(c5843.27,4185.13) 5843.27,4146.45 5910,4146.45 5920,4146.45 5923.52,4146.45 5936.24,4146.43 ; 5815.92,4379.7 cw(c5843.27,4352.35) 5843.27,4391.03 5910,4391.03 5920,4391.03 5924.74,4391.03 5973.97,4391.03 5987.19,4377.81 ; 5815.92,4615.92 cw(c5843.27,4588.57) 5843.27,4627.25 ; 5815.92,4615.92 cw(c5843.27,4588.57) 5843.27,4627.25 ; 5843.27,4627.25 5910,4627.25 5920,4627.25 5924.74,4627.25 ; 5936.24,4146.43 5942.4,4146.43 ; 5936.24,4146.43 5942.39,4146.42
  Top Layer w5: 5220,730 5255,765 5410,765 5457.5,812.5 5457.5,1124.16 5349,1232.66 5349,2101.88 5417.62,2170.5 5990.5,2170.5 6005,2185 6005,2208.37 ; 5510,726.82 5490.5,746.32 5490.5,1137.83 5382,1246.33 5382,2088.21 5431.29,2137.5 6102.5,2137.5 6140,2175 6140,2208.37 ; 5523.5,915 5523.5,995 ; 5732.65,802.5 5725,802.5 ; 5850,730 5850,740 5787.5,802.5 5725,802.5 ; 6251,2216 ccw(c6240.19,2226.81) U61.36@6255.47,2226.81 ; U61.36@6258.97,2240 6258.97,2223.97 6139.5,2104.5 5444.96,2104.5 5415,2074.54 5415,1260 5523.5,1151.5 5523.5,995 ; 5523.5,995 5523.5,803.32 5524.32,802.5 5725,802.5